# Altium PCB V3.2_Board.PcbDoc (part 3 of 9)
Units mil, origin at the board's own origin, x right, y up, seen from the top; angles counter-clockwise.
Board outline 7795.28 x 4881.89 mil, 2 copper layers (Top Layer, Bottom Layer), stack 57 mil thick; 419 components, 273 nets, 1244 pads, 414 vias.
Unrouted connection lines stored in the file: 3.
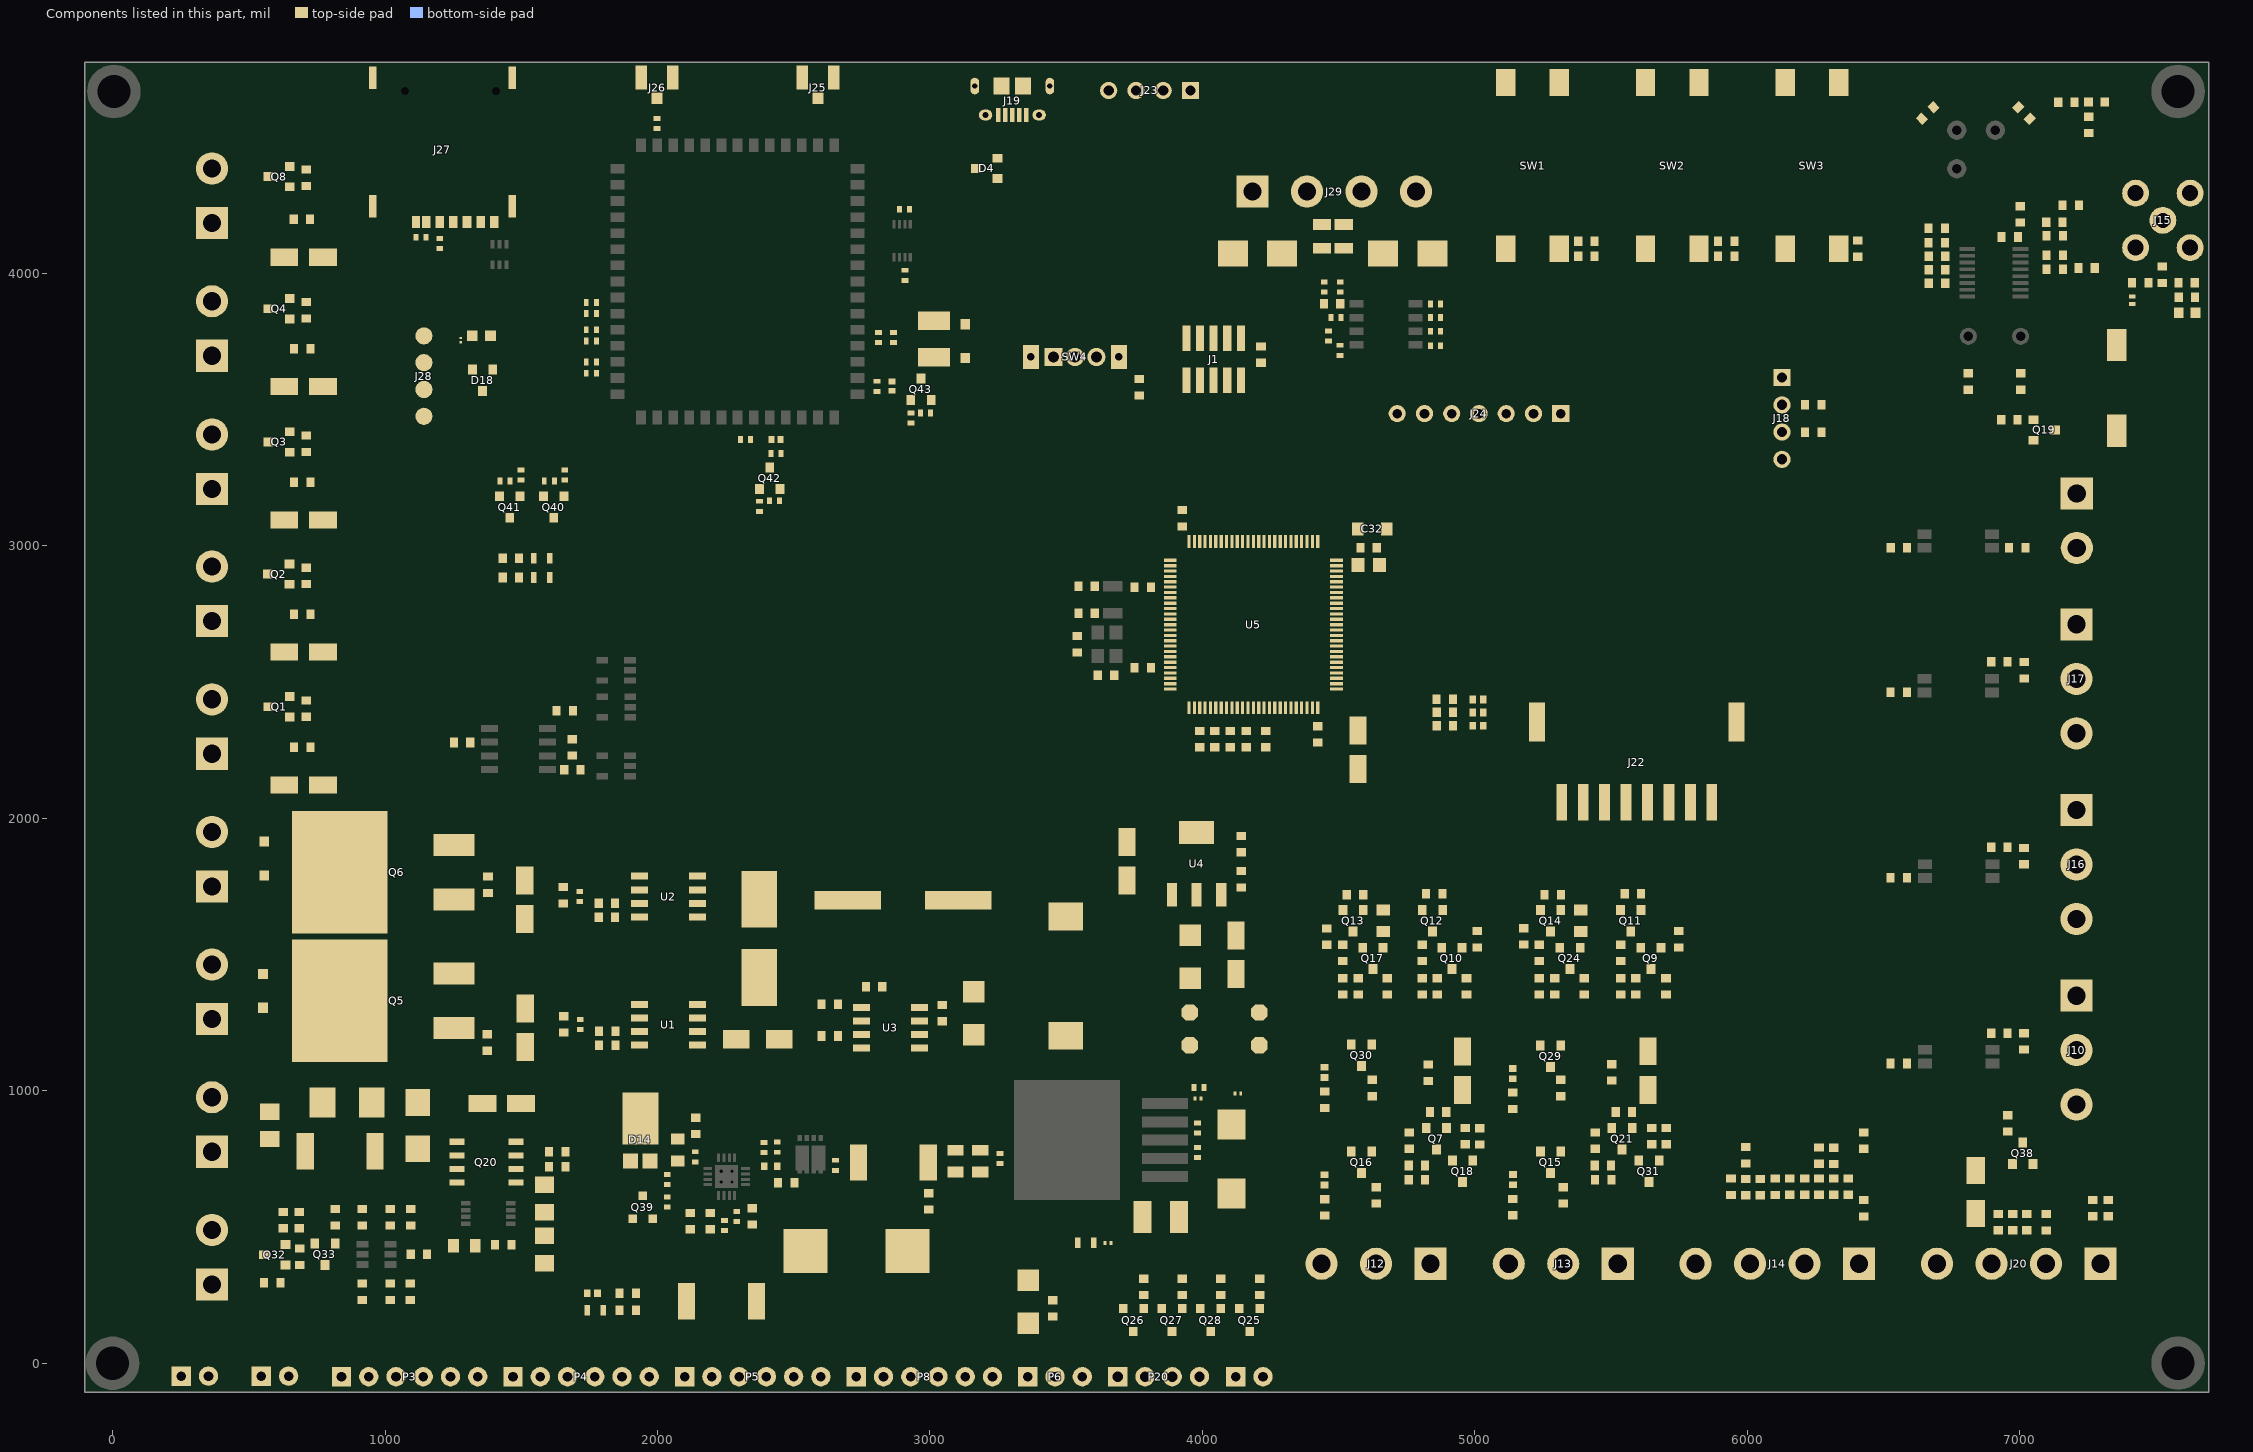
[diagram p2: the components of this part, seen from the top]

## Part data (continued)
C96 C97 C98: library part CC0402JRNPO9BN220, "CAP CER 22PF 50V C0G/NPO 0402", Case Code (Imperial)=0402, Case Code (Metric)=1005, Dielectric=C0G, Dielectric Material=Ceramic, Insulation Resistance=100GR, LCSC Part Number=C106203, Manufacturer=Yageo, Max Operating Temperature=125°C, Min Operating Temperature=-55°C, Package Quantity=1, Supplier Part Number 1=9105957, Temperature Coefficient=30ppm/°C, Tolerance=5%, Voltage=50V, Case/Package=0402, Category="Ceramic Capacitors", ComponentLink1Description=https://datasheet.ciiva.com/5789/1443161-5789509.pdf?src-supplier=Farnell, ComponentLink1URL=https://datasheet.ciiva.com/5789/1443161-5789509.pdf?src-supplier=Farnell, ComponentLink2Description=https://datasheet.ciiva.com/8033/1443161-8033606.pdf?src-supplier=Element14, ComponentLink2URL=https://datasheet.ciiva.com/8033/1443161-8033606.pdf?src-supplier=Element14, ComponentLink3Description=https://datasheet.ciiva.com/7656/1132289-7656615.pdf?src-supplier=Element14, ComponentLink3URL=https://datasheet.ciiva.com/7656/1132289-7656615.pdf?src-supplier=Element14, ComponentLink4Description=https://datasheet.ciiva.com/8033/1443161-8033607.pdf?src-supplier=Element14, ComponentLink4URL=https://datasheet.ciiva.com/8033/1443161-8033607.pdf?src-supplier=Element14, ComponentLink5Description=https://datasheet.ciiva.com/8033/1443161-8033605.pdf?src-supplier=Element14, ComponentLink5URL=https://datasheet.ciiva.com/8033/1443161-8033605.pdf?src-supplier=Element14, ComponentLink6Description=https://datasheet.ciiva.com/143/mlccorderingcode-143987.pdf?src-supplier=Digi-Key, ComponentLink6URL=https://datasheet.ciiva.com/143/mlccorderingcode-143987.pdf?src-supplier=Digi-Key, ComponentLink7Description=https://datasheet.ciiva.com/143/mlccorderingcode-143986.pdf?src-supplier=Digi-Key, ComponentLink7URL=https://datasheet.ciiva.com/143/mlccorderingcode-143986.pdf?src-supplier=Digi-Key, ComponentLink8Description=https://datasheet.ciiva.com/143/mlccorderingcode-143988.pdf?src-supplier=Digi-Key, ComponentLink8URL=https://datasheet.ciiva.com/143/mlccorderingcode-143988.pdf?src-supplier=Digi-Key, ComponentLink9Description=https://datasheet.ciiva.com/5425/upy-gp-np0-16v-to-50v-8-5425483.pdf?src-supplier=Mouser, ComponentLink9URL=https://datasheet.ciiva.com/5425/upy-gp-np0-16v-to-50v-8-5425483.pdf?src-supplier=Mouser, ComponentLink10Description=https://datasheet.ciiva.com/15189/getdatasheetpartid-370074-15189117.pdf?src-supplier=Verical, ComponentLink10URL=https://datasheet.ciiva.com/15189/getdatasheetpartid-370074-15189117.pdf?src-supplier=Verical, Depth=0.5mm, Height=0.5mm, Item Type=Capacitor, Lead Free="Lead Free", Length=1mm, Manufacturer Part Number=CC0402JRNPO9BN220, Mounting Technology="Surface Mount", Packaging="Tape and Reel", Pins=2, Pricing 1="10000=0.00220, 40000=0.00210, 150000=0.00200, 400000=0.00190, 1000000=0.00180 (USD)", Radiation Hardening=No, Reach SVHC Compliant=Yes, Resistor Type=Ceramic, RoHS=Yes, RoHS Compliant=Yes, Series=CC, Stock 1=200000, Supplier 1="Future Electronics", Termination=SMD/SMT, Thickness=0.022inch, Voltage Rating=50V, Voltage Rating (DC)=50V, Width=0.02inch
D1: "40V 500mV@2A 2A SMA(DO-214AC) Schottky Barrier Diodes (SBD) ROHS", Manufacturer=Yangzhou, ComponentLink1Description=LCSC, ComponentLink1URL=https://lcsc.com/product-detail/Schottky-Barrier-Diodes-SBD_Yangzhou-Yangjie-Elec-Tech-SS24A_C211773.html, Manufacturer Part Number=SS24A
D2: "DIODE ZENER 16V 1.5W SMA", Case/Package=SMA, Forward Voltage=1.5V, Manufacturer="ON Semiconductor", Max Operating Temperature=150°C, Max Power Dissipation=1.5W, Max Reverse Current=500nA, Min Operating Temperature=-65°C, Package Quantity=1, Power Dissipation=500mW, Supplier Part Number 1=26K5257, Test Current=23.4mA, Tolerance=5%, Voltage Rating (DC)=16V, Zener Current=94mA, Category="Zener Diodes", ComponentLink1Description=https://datasheet.ciiva.com/15142/getdatasheetpartid-39534-15142033.pdf?src-supplier=Verical, ComponentLink1URL=https://datasheet.ciiva.com/15142/getdatasheetpartid-39534-15142033.pdf?src-supplier=Verical, ComponentLink2Description=https://datasheet.ciiva.com/30478/0900766b8127698c-30478429.pdf?src-supplier=RSComponents, ComponentLink2URL=https://datasheet.ciiva.com/30478/0900766b8127698c-30478429.pdf?src-supplier=RSComponents, ComponentLink3Description=https://datasheet.ciiva.com/8026/1sma5913bt3-d-8026927.pdf?src-supplier=Element14, ComponentLink3URL=https://datasheet.ciiva.com/8026/1sma5913bt3-d-8026927.pdf?src-supplier=Element14, ComponentLink4Description=https://datasheet.ciiva.com/26092/1sma5913bt3-d-26092437.pdf?src-supplier=Avnet+Europe, ComponentLink4URL=https://datasheet.ciiva.com/26092/1sma5913bt3-d-26092437.pdf?src-supplier=Avnet+Europe, ComponentLink5Description=https://datasheet.ciiva.com/895/1sma5913bt3-d-895337.pdf?src-supplier=Digi-Key, ComponentLink5URL=https://datasheet.ciiva.com/895/1sma5913bt3-d-895337.pdf?src-supplier=Digi-Key, ComponentLink6Description=https://datasheet.ciiva.com/895/1sma5913bt3-d-895338.pdf?src-supplier=Digi-Key, ComponentLink6URL=https://datasheet.ciiva.com/895/1sma5913bt3-d-895338.pdf?src-supplier=Digi-Key, ComponentLink7Description=https://datasheet.ciiva.com/895/1sma5913bt3-d-895336.pdf?src-supplier=Digi-Key, ComponentLink7URL=https://datasheet.ciiva.com/895/1sma5913bt3-d-895336.pdf?src-supplier=Digi-Key, ComponentLink8Description=https://datasheet.ciiva.com/49028/70339291-49028059.pdf?src-supplier=Allied+Electronics, ComponentLink8URL=https://datasheet.ciiva.com/49028/70339291-49028059.pdf?src-supplier=Allied+Electronics, Contact Plating=Tin,Matte, Element Configuration=Single, ESD Protection=Yes, Halogen Free="Halogen Free", Height=2.05mm, Impedance=10R, Lead Free="Lead Free", Length=4.57mm, Manufacturer Part Number=1SMA5930BT3G, Max Reverse Leakage Current=500nA, Number of Pins=2, Packaging="Tape and Reel", Power Rating=1.5W, Pricing 1="5000=0.16900 (USD)", Radiation Hardening=No, REACH SVHC="No SVHC", RoHS=Yes, RoHS Compliant=Yes, Stock 1=52, Supplier 1=Avnet, Voltage Tolerance=5%, Width=2.92mm, Working Voltage=16V, Zener Voltage=16V
D3: "800uA 43.5A 9.2V 6.4V 5V 7V Bi-Directional SMA TVS ROHS", Manufacturer="Shandong Jingdao Microelectronics", ComponentLink1Description=LCSC, ComponentLink1URL=https://lcsc.com/product-detail/TVS_Shandong-Jingdao-Microelectronics-SMAJ5-0CA_C353441.html, Manufacturer Part Number=SMAJ5.0CA
D4 D18: "16A 20V 7V 5V@Max Unidirectional SOT-23 TVS ROHS", LCSC Part Number=C239643, Manufacturer=WILLSEMI, Package=SOT-23, ComponentLink1Description=LCSC, ComponentLink1URL=https://www.lcsc.com/product-detail/TVS_WILLSEMI-Will-Semicon-ESD5302F-3-TR_C239643.html, Item Type=Diode, Manufacturer Part Number=ESD5302F-3/TR
D5 D8: "SMB(DO-214AA) TVS ROHS", LCSC Part Number=C5331111, Manufacturer=MSKSEMI, Package=SMB(DO-214AA), ComponentLink1Description=LCSC, ComponentLink1URL=https://www.lcsc.com/product-detail/TVS_MSKSEMI-SMBJ26CA_C5331111.html, Item Type=Diode, Manufacturer Part Number=SMBJ26CA
D6: "1uA 5.3A 113V 77.8V 70V 86V Unidirectional SMB(DO-214AA) TVS ROHS", Manufacturer=Brightking, ComponentLink1Description=LCSC, ComponentLink1URL=https://www.lcsc.com/product-detail/TVS_Brightking-SMBJ70A-TR13_C309982.html, Manufacturer Part Number=SMBJ70A/TR13
D7: "SCHOTTKY DIODE SMB 100V 5A", Manufacturer=MDD, ComponentLink1Description=LCSC, ComponentLink1URL=https://lcsc.com/product-detail/Schottky-Barrier-Diodes-SBD_WEIDA-SS510B_C2915231.html, Manufacturer Part Number=SS510B
D11: "20V 500mV@3A 3A SMA(DO-214AC) Schottky Barrier Diodes (SBD) ROHS", LCSC Part Number=C34897, Manufacturer=MDD, Manufacturer Part Number=SS32, Package=SMA(DO-214AC), ComponentLink1Description=LCSC, ComponentLink1URL=https://www.lcsc.com/product-detail/Schottky-Barrier-Diodes-SBD_MDD-Microdiode-Electronics-SS32_C34897.html, Item Type=Diode
D12: "TVS DIODE 5VWM 9.2VC SMA", LCSC Part Number=Diode, Manufacturer=FTR, Package=SMA(DO-214AC), ComponentLink1Description=LCSC, ComponentLink1URL=https://www.lcsc.com/product-detail/TVS_GOODWORK-SMAJ5-0CA_C908809.html, Item Type=C693487, Manufacturer Part Number=SMAJ5.0CA
D13: "DIODE ZENER 5.1V 500MW SOD123", Breakdown Voltage=5.36V, Case/Package=SOD-123-2, Forward Voltage=900mV, LCSC Part Number=C66198, Manufacturer="ON Semiconductor", Max Operating Temperature=150°C, Max Power Dissipation=500mW, Max Reverse Current=5uA, Min Operating Temperature=-55°C, Package Quantity=3000, Supplier Part Number 1=70099546, Test Current=20mA, Tolerance=5%, Voltage Rating (DC)=5.1V, Zener Current=10mA, Category="Zener Diodes", ComponentLink1Description=https://datasheet.ciiva.com/23815/1708301-23815376.pdf?src-supplier=Newark, ComponentLink1URL=https://datasheet.ciiva.com/23815/1708301-23815376.pdf?src-supplier=Newark, ComponentLink2Description=https://datasheet.ciiva.com/22626/1708301-22626967.pdf?src-supplier=Element14, ComponentLink2URL=https://datasheet.ciiva.com/22626/1708301-22626967.pdf?src-supplier=Element14, ComponentLink3Description=https://datasheet.ciiva.com/4731/mmsz5221bt1-d-4731452.pdf?src-supplier=Mouser, ComponentLink3URL=https://datasheet.ciiva.com/4731/mmsz5221bt1-d-4731452.pdf?src-supplier=Mouser, ComponentLink4Description=https://datasheet.ciiva.com/16200/mmsz5221bt1-d-16200104.pdf?src-supplier=Future+Electronics, ComponentLink4URL=https://datasheet.ciiva.com/16200/mmsz5221bt1-d-16200104.pdf?src-supplier=Future+Electronics, ComponentLink5Description=https://datasheet.ciiva.com/894/mmsz5221bt1-d-894882.pdf?src-supplier=Digi-Key, ComponentLink5URL=https://datasheet.ciiva.com/894/mmsz5221bt1-d-894882.pdf?src-supplier=Digi-Key, ComponentLink6Description=https://datasheet.ciiva.com/894/mmsz5221bt1-d-894883.pdf?src-supplier=Digi-Key, ComponentLink6URL=https://datasheet.ciiva.com/894/mmsz5221bt1-d-894883.pdf?src-supplier=Digi-Key, ComponentLink7Description=https://datasheet.ciiva.com/894/mmsz5221bt1-d-894881.pdf?src-supplier=Digi-Key, ComponentLink7URL=https://datasheet.ciiva.com/894/mmsz5221bt1-d-894881.pdf?src-supplier=Digi-Key, Height=1.12mm, Impedance=17R, Item Type=Diode, Lead Free="Lead Free", Length=2.69mm, Manufacturer Part Number=MMSZ5231BT1G, Material=Plastic, Max Reverse Leakage Current=5uA, Packaging="Tape and Reel", Pins=2, Power Dissipation=500mW, Power Rating=500mW, Reach SVHC Compliant=No, RoHS=Yes, RoHS Compliant=Yes, Series="Automotive, AEC-Q101", Supplier 1="Allied Electronics", Voltage Tolerance=5%, Width=1.6mm, Working Voltage=5.1V, Zener Voltage=5.1V
D14: "DIODE SCHOTTKY 40V 10A POWERDI5", Average Rectified Current=10A, Forward Voltage=510mV, Manufacturer=Diodes, Max Forward Surge Current (Ifsm)=275A, Max Operating Temperature=180°C, Max Repetitive Reverse Voltage (Vrrm)=40V, Max Reverse Current=700uA, Min Operating Temperature=-65°C, Package Quantity=5000, Supplier Part Number 1=7514648, Category="Rectifier Diodes", ComponentLink1Description=https://datasheet.ciiva.com/34302/1541335-34302410.pdf?src-supplier=Jameco, ComponentLink1URL=https://datasheet.ciiva.com/34302/1541335-34302410.pdf?src-supplier=Jameco, ComponentLink2Description=https://datasheet.ciiva.com/4715/ds30538-79818-4715685.pdf?src-supplier=Mouser, ComponentLink2URL=https://datasheet.ciiva.com/4715/ds30538-79818-4715685.pdf?src-supplier=Mouser, ComponentLink3Description=https://datasheet.ciiva.com/8300/ds30538-8300993.pdf?src-supplier=Avnet, ComponentLink3URL=https://datasheet.ciiva.com/8300/ds30538-8300993.pdf?src-supplier=Avnet, ComponentLink4Description=https://datasheet.ciiva.com/7964/ds30538-7964283.pdf?src-supplier=Element14, ComponentLink4URL=https://datasheet.ciiva.com/7964/ds30538-7964283.pdf?src-supplier=Element14, ComponentLink5Description=https://datasheet.ciiva.com/16215/ds30538-16215597.pdf?src-supplier=Future+Electronics, ComponentLink5URL=https://datasheet.ciiva.com/16215/ds30538-16215597.pdf?src-supplier=Future+Electronics, ComponentLink6Description=https://datasheet.ciiva.com/915/ds30538-915075.pdf?src-supplier=Digi-Key, ComponentLink6URL=https://datasheet.ciiva.com/915/ds30538-915075.pdf?src-supplier=Digi-Key, ComponentLink7Description=https://datasheet.ciiva.com/915/ds30538-915076.pdf?src-supplier=Digi-Key, ComponentLink7URL=https://datasheet.ciiva.com/915/ds30538-915076.pdf?src-supplier=Digi-Key, ComponentLink8Description=https://datasheet.ciiva.com/915/ds30538-915074.pdf?src-supplier=Digi-Key, ComponentLink8URL=https://datasheet.ciiva.com/915/ds30538-915074.pdf?src-supplier=Digi-Key, Contact Plating=Tin,Matte, Current Rating=10A, Element Configuration="Common Anode", Forward Current=10A, Height=1.15mm, Lead Free="Lead Free", Length=4.05mm, Manufacturer Part Number=PDS1040-13, Max Reverse Voltage (DC)=40V, Mount="Surface Mount", Number of Pins=5, Output Current=10A, Packaging="Tape and Reel", Peak Non-Repetitive Surge Current=275A, Polarity=Standard, Pricing 1="5=1.28400, 50=1.16000, 250=1.05000, 1250=0.93400, 2500=0.82200 (GBP)", Radiation Hardening=No, REACH SVHC="No SVHC", RoHS=Yes, RoHS Compliant=Yes, Series=-, Stock 1=140, Supplier 1=RSComponents, Termination=SMD/SMT, Voltage Rating (DC)=40V, Weight=0.003386oz, Width=5.45mm
D15: "DIODE SCHOTTKY 40V 380MA SOD523", Average Rectified Current=380mA, Forward Current=650mA, Forward Voltage=1V, LCSC Part Number=C139441, Manufacturer="Diodes Zetex", Max Forward Surge Current (Ifsm)=6A, Max Operating Temperature=150°C, Max Power Dissipation=357mW, Max Repetitive Reverse Voltage (Vrrm)=40V, Max Reverse Current=4uA, Min Operating Temperature=-55°C, Package Quantity=3000, Supplier Part Number=8115933, Category="Schottky Diodes", ComponentLink1Description=https://datasheet.ciiva.com/4715/zlls350-4715700.pdf?src-supplier=Mouser, ComponentLink1URL=https://datasheet.ciiva.com/4715/zlls350-4715700.pdf?src-supplier=Mouser, ComponentLink2Description=https://datasheet.ciiva.com/4715/zlls350-4715700.pdf?src-supplier=Avnet, ComponentLink2URL=https://datasheet.ciiva.com/4715/zlls350-4715700.pdf?src-supplier=Avnet, ComponentLink3Description=https://datasheet.ciiva.com/914/zlls350-914217.pdf?src-supplier=Digi-Key, ComponentLink3URL=https://datasheet.ciiva.com/914/zlls350-914217.pdf?src-supplier=Digi-Key, ComponentLink4Description=https://datasheet.ciiva.com/914/zlls350-914218.pdf?src-supplier=Digi-Key, ComponentLink4URL=https://datasheet.ciiva.com/914/zlls350-914218.pdf?src-supplier=Digi-Key, ComponentLink5Description=https://datasheet.ciiva.com/914/zlls350-914216.pdf?src-supplier=Digi-Key, ComponentLink5URL=https://datasheet.ciiva.com/914/zlls350-914216.pdf?src-supplier=Digi-Key, Current Rating=380mA, Diode Type=RECTIFIER, Height=0.8mm, Item Type=Diode, Lead Free="Lead Free", Length=1.3mm, Manufacturer Part Number=ZLLS350TA, Max Reverse Voltage (DC)=40V, Mounting Technology="Surface Mount", Output Current=380mA, Packaging="Tape and Reel", Peak Non-Repetitive Surge Current=6A, Pins=2, Polarity=Standard, Power Dissipation=357mW, Power Rating=357mW, Pricing="3000=0.102, 9000=0.0979, 12000=0.0969, 30000=0.0937, 45000=0.0906 (USD)", Radiation Hardening=No, Reverse Recovery Time=1ns, RoHS=Yes, RoHS Compliant=Yes, Series=-, Stock=78000, Supplier="Future Electronics", Termination=SMD/SMT, Voltage Rating (DC)=40V, Weight=3.5E-05oz, Width=0.9mm
D16 D19: "35A@8/20us 15V 4.5V@Max Unidirectional DFN1006 TVS ROHS", LCSC Part Number=C239784, Manufacturer="WILLSEMI(Will Semicon)", Package=DFN1006, ComponentLink1Description=LCSC, ComponentLink1URL=https://www.lcsc.com/product-detail/TVS_WILLSEMI-Will-Semicon-ESD5651N-2-TR_C239784.html, Item Type=Diode, Manufacturer Part Number=ESD5651N-2/TR
D17: "TVS DIODE 5VWM 6.3VC DSN0603-2", LCSC Part Number=C477989, Manufacturer=Nexperia, Category="ESD and Circuit Protection ICs", ComponentLink1Description=http://www.farnell.com/datasheets/1961312.pdf?src-supplier=Farnell, ComponentLink1URL=http://www.farnell.com/datasheets/1961312.pdf?src-supplier=Farnell, ComponentLink2Description=https://assets.nexperia.com/documents/data-sheet/PESD5V0H1BSF.pdf?src-supplier=Digi-Key, ComponentLink2URL=https://assets.nexperia.com/documents/data-sheet/PESD5V0H1BSF.pdf?src-supplier=Digi-Key, ComponentLink3Description=http://www.farnell.com/datasheets/1961312.pdf?src-supplier=Newark, ComponentLink3URL=http://www.farnell.com/datasheets/1961312.pdf?src-supplier=Newark, Item Type=Diode, Manufacturer Part Number=PESD5V0H1BSFYL, Pricing 1="18000=0.06453, 36000=0.06278, 54000=0.06104, 90000=0.05930, 180000=0.05755, 900000=0.05581, 1800000=0.05406 (USD)", RoHS=Yes, RoHS Compliant=Yes, Stock 1=9000, Supplier 1=Avnet, Supplier Part Number 1=PESD5V0H1BSFYL
D25 D26: "DIODE GEN PURP 100V 300MA SOD123", Average Rectified Current=300mA, Current Rating=150mA, Forward Voltage=1.25V, LCSC Part Number=C83528, Manufacturer=Diodes, Max Forward Surge Current (Ifsm)=2A, Max Operating Temperature=150°C, Max Repetitive Reverse Voltage (Vrrm)=100V, Max Reverse Current=1uA, Min Operating Temperature=-65°C, Package Quantity=3000, Power Dissipation=400mW, Supplier Part Number 1=7634694, Voltage Rating (DC)=75V, Category="Rectifier Diodes", ComponentLink1Description=https://datasheet.ciiva.com/1179/1915529-1179304.pdf?src-supplier=Element14, ComponentLink1URL=https://datasheet.ciiva.com/1179/1915529-1179304.pdf?src-supplier=Element14, ComponentLink2Description=https://datasheet.ciiva.com/22695/1915529-22695239.pdf?src-supplier=Element14, ComponentLink2URL=https://datasheet.ciiva.com/22695/1915529-22695239.pdf?src-supplier=Element14, ComponentLink3Description=https://datasheet.ciiva.com/8300/ds30086-8300392.pdf?src-supplier=Avnet, ComponentLink3URL=https://datasheet.ciiva.com/8300/ds30086-8300392.pdf?src-supplier=Avnet, ComponentLink4Description=https://datasheet.ciiva.com/15219/getdatasheetpartid-110030-15219548.pdf?src-supplier=Verical, ComponentLink4URL=https://datasheet.ciiva.com/15219/getdatasheetpartid-110030-15219548.pdf?src-supplier=Verical, ComponentLink5Description=https://datasheet.ciiva.com/8303/ds30086-8303197.pdf?src-supplier=Avnet, ComponentLink5URL=https://datasheet.ciiva.com/8303/ds30086-8303197.pdf?src-supplier=Avnet, ComponentLink6Description=https://datasheet.ciiva.com/911/ds30086-911735.pdf?src-supplier=Digi-Key, ComponentLink6URL=https://datasheet.ciiva.com/911/ds30086-911735.pdf?src-supplier=Digi-Key, ComponentLink7Description=https://datasheet.ciiva.com/911/ds30086-911736.pdf?src-supplier=Digi-Key, ComponentLink7URL=https://datasheet.ciiva.com/911/ds30086-911736.pdf?src-supplier=Digi-Key, ComponentLink8Description=https://datasheet.ciiva.com/911/ds30086-911734.pdf?src-supplier=Digi-Key, ComponentLink8URL=https://datasheet.ciiva.com/911/ds30086-911734.pdf?src-supplier=Digi-Key, ComponentLink9Description=https://datasheet.ciiva.com/4435/ds30086-4435128.pdf?src-supplier=Mouser, ComponentLink9URL=https://datasheet.ciiva.com/4435/ds30086-4435128.pdf?src-supplier=Mouser, Contact Plating=Tin,Matte, Element Configuration=Single, Forward Current=150mA, Height=1.25mm, Item Type=Diode, Lead Free="Lead Free", Length=2.85mm, Manufacturer Part Number=1N4148W-7-F, Max Reverse Voltage (DC)=100V, Max Surge Current=2A, Mounting Technology="Surface Mount", Output Current=150mA, Packaging="Tape and Reel", Peak Non-Repetitive Surge Current=2A, Pins=2, Polarity=Standard, Power Rating=400mW, Pricing 1="3000=0.01840, 12000=0.01760, 45000=0.01690, 120000=0.01640, 300000=0.01560 (USD)", Radiation Hardening=No, Reach SVHC Compliant=Yes, Recovery Time=4ns, Reverse Recovery Time=4ns, Reverse Recovery Time-Max=4ns, RoHS=Yes, RoHS Compliant=Yes, Series=-, Stock 1=32931000, Supplier 1="Future Electronics", Voltage=100V, Weight=0.000353oz, Width=1.7mm
F1: "6V 500mA 40A 1A 0603 Resettable Fuses ROHS", LCSC Part Number=C69679, Manufacturer=TECHFUSE, Category=Uncategorized, ComponentLink1Description=LCSC, ComponentLink1URL=https://www.lcsc.com/product-detail/Resettable-Fuses_TECHFUSE-SMD0603-050_C69679.html, Item Type=Fuse, Manufacturer Part Number=SMD0603-050, RoHS=No, Supplier 1=LCSC, Supplier Part Number 1=C69679
F2 F3: "9V 200mA 100A 500mA 0805 Resettable Fuses ROHS", LCSC Part Number=C20976, Manufacturer=RUILON, Package=0805, ComponentLink1Description=LCSC, ComponentLink1URL=https://www.lcsc.com/product-detail/Resettable-Fuses_RUILON-Shenzhen-Ruilongyuan-Elec-SMD0805P020TF_C20976.html, Item Type=Fuse, Manufacturer Part Number=SMD0805P020TF
J1: "CONN HEADER SMD 10POS 1.27MM", Color=Black, Contact Resistance=30mR, Current Rating=1A, Insulation Resistance=100MR, LCSC Part Number=C150517, Manufacturer="Amphenol FCI", Max Operating Temperature=85°C, Max Voltage Rating (AC)=125V, Min Operating Temperature=-40°C, Package Quantity=600, Supplier Part Number 1=609-3695-6-ND, ComponentLink1Description=https://www.verical.com/server-webapp/html/getDatasheet?partID=177140&src-supplier=Verical, ComponentLink1URL=https://www.verical.com/server-webapp/html/getDatasheet?partID=177140&src-supplier=Verical, ComponentLink2Description=http://portal.fciconnect.com/Comergent/fci/drawing/20021121.pdf?src-supplier=Avnet, ComponentLink2URL=http://portal.fciconnect.com/Comergent/fci/drawing/20021121.pdf?src-supplier=Avnet, ComponentLink3Description=https://cdn.amphenol-icc.com/media/wysiwyg/files/drawing/20021121.pdf?src-supplier=Digi-Key, ComponentLink3URL=https://cdn.amphenol-icc.com/media/wysiwyg/files/drawing/20021121.pdf?src-supplier=Digi-Key, ComponentLink4Description=http://portal.fciconnect.com/Comergent/fci/drawing/20021121.pdf?src-supplier=Avnet+Europe, ComponentLink4URL=http://portal.fciconnect.com/Comergent/fci/drawing/20021121.pdf?src-supplier=Avnet+Europe, ComponentLink5Description=https://media.digikey.com/pdf/Data%20Sheets/FCI%20PDFs/Minitek%20127_Catalog.pdf?src-supplier=Digi-Key, ComponentLink5URL=https://media.digikey.com/pdf/Data%20Sheets/FCI%20PDFs/Minitek%20127_Catalog.pdf?src-supplier=Digi-Key, ComponentLink6Description=http://portal.fciconnect.com/Comergent//fci/drawing/20021121.pdf?src-supplier=Mouser, ComponentLink6URL=http://portal.fciconnect.com/Comergent//fci/drawing/20021121.pdf?src-supplier=Mouser, Connector Type="Male Pin,Header", Contact Material="Copper Alloy,Copper,Gold", Contact Mating Length=0.12inch, Contact Plating=Gold, Depth=3.4mm, Gender=Male, Housing Color=Black, Housing Material=Thermoplastic, Item Type="Jtag Header", Length=6.35mm, Manufacturer Part Number=20021121-00010C4LF, Mount="Surface Mount", Number of Contacts=10, Number of Positions=10, Number of Rows=2, Orientation=Straight, Packaging="Tape and Reel", Pitch=1.27mm, Pricing 1="1=0.87, 10=0.761, 100=0.6563 (USD)", Radiation Hardening=No, REACH SVHC="No SVHC", Row Spacing=0.05inch, Stack Height=3mm, Stock 1=0, Supplier 1=Digi-Key, Termination=Solder, Voltage Rating=125V
J2 J3 J4 J5 J6 J7 J8 J9 J10 J11 J12 J13 J14 J16 J17 J20 J21 J29: "TERMINAL BLOCK, PLUGGABLE, 5.08,", Manufacturer="CUI Devices", Category="Terminal Blocks", RoHS=Yes, Supplier 1="Arrow Electronics"
  J2 J3 J4 J5 J6 J7 J8 J9 J11 J21: Manufacturer Part Number=TBP01R1-508-02BE, Pricing 1="1=0.57450, 10=0.23530, 25=0.18730, 50=0.17170, 100=0.16040, 400=0.14010, 800=0.12060, 1200=0.11290 (USD)", Stock 1=1821, Supplier Part Number 1=TBP01R1-508-02BE
  J10 J12 J13 J16 J17: Manufacturer Part Number=TBP01R1-508-03BE, Pricing 1="1=0.52380, 10=0.21370, 100=0.18450, 600=0.17070 (USD)", Stock 1=2069, Supplier Part Number 1=TBP01R1-508-03BE
  J14 J20 J29: Manufacturer Part Number=TBP01R1-508-04BE, Pricing 1="1=0.77380, 10=0.29040, 25=0.28750, 50=0.25070, 200=0.24820, 400=0.24580, 600=0.22570 (USD)", Stock 1=697, Supplier Part Number 1=TBP01R1-508-04BE
J15: "1 Inner bore SMA Board Edge Bend -55℃~+155℃ 50Ω Plugin RF Connectors / Coaxial Connectors ROHS", Manufacturer="HJ Tech", ComponentLink1Description=LCSC, ComponentLink1URL=https://lcsc.com/product-detail/RF-Connectors-Coaxial-Connectors_HJ-Tech-HJ-SMA508_C1509209.html, Manufacturer Part Number=HJ-SMA508
J18: "2.54mm Plugin 3A bronze -40℃~+105℃ Straight 1x4P Top 4 Square Holes Plugin,P=2.54mm Female Headers ROHS", Manufacturer=BOOMELE, Package=Plugin,P=2.54mm, ComponentLink1Description=LCSC, ComponentLink1URL=https://www.lcsc.com/product-detail/Female-Headers_BOOMELE-Boom-Precision-Elec-C2718488_C2718488.html, Item Type=Header, LCSC Part Number=C2718488, Manufacturer Part Number=C2718488
J19: "CONN RCPT USB2.0 MICRO B SMD R/A", Color=Black, Current Rating=1.8A, Flammability Rating="UL94 V-0", Insulation Resistance=1GR, LCSC Part Number=C132563, Manufacturer="Amphenol FCI", Max Operating Temperature=85°C, Max Voltage Rating (AC)=100V, Min Operating Temperature=-55°C, Package Quantity=9600, Supplier Part Number 1=609-4618-1-ND, ComponentLink1Description=http://www.amphenol-icc.com/media/wysiwyg/files/drawing/10118194.pdf?src-supplier=Digi-Key, ComponentLink1URL=http://www.amphenol-icc.com/media/wysiwyg/files/drawing/10118194.pdf?src-supplier=Digi-Key, ComponentLink2Description=https://cdn.amphenol-icc.com/media/wysiwyg/files/drawing/10118194.pdf?src-supplier=Mouser, ComponentLink2URL=https://cdn.amphenol-icc.com/media/wysiwyg/files/drawing/10118194.pdf?src-supplier=Mouser, ComponentLink3Description=https://cdn.amphenol-icc.com/media/wysiwyg/files/drawing/10118194.pdf?src-supplier=Verical, ComponentLink3URL=https://cdn.amphenol-icc.com/media/wysiwyg/files/drawing/10118194.pdf?src-supplier=Verical, Connector Type=USB,Receptacle, Contact Material="Copper Alloy", Contact Plating=Gold, Depth=5mm, Features=Shielded, Gender=Receptacle, Housing Material=Polymer, Item Type="USB Connector", Lead Free="Lead Free", Length=8.05mm, Manufacturer Part Number=10118194-0001LF, Mount="Surface Mount,Horizontal", Number of Contacts=5, Number of Ports=1, Number of Terminals=5, Orientation="Right Angle", Packaging="Tape and Reel", Pitch=0.65mm, Pricing 1="1=0.43, 10=0.405, 25=0.3648, 50=0.3242, 100=0.3107, 250=0.28368, 500=0.27016 (USD)", Radiation Hardening=No, Stock 1=35943, Supplier 1=Digi-Key, Termination=Solder
J22: "1x8P PH 1 2mm 8 Brass SMD,P=2mm Wire To Board / Wire To Wire Connector ROHS", LCSC Part Number=C273136, Manufacturer=CJT, Package=SMD,P=2mm, ComponentLink1Description=LCSC, ComponentLink1URL=https://www.lcsc.com/product-detail/_Changjiang-Connectors-A2008WR-S-8P_C273136.html, Item Type="Wire To Wire Connector", Manufacturer Part Number=A2008WR-S-8P
J23: "Straight 2.54mm Black Brass 1x4P Plugin,P=2.54mm Pin Headers ROHS", LCSC Part Number=C124378, Manufacturer=Ckmtw, ComponentLink1Description=LCSC, ComponentLink1URL=https://www.lcsc.com/product-detail/Pin-Headers_Ckmtw-Shenzhen-Cankemeng-B-2100S04P-A110_C124378.html, Item Type=Header, Manufacturer Part Number=B-2100S04P-A110
J24: "Straight Square Pins 2.5mm 7P 6mm -40℃~+105℃ 3mm 2.54mm Plugin Black Brass 1x7P Plugin,P=2.54mm Pin Headers ROHS", LCSC Part Number=C492406, Manufacturer=XFCN, Package=Plugin,P=2.54mm, ComponentLink1Description=LCSC, ComponentLink1URL=https://www.lcsc.com/product-detail/span-style-background-color-ff0-Pin-span-Headers_XFCN-PZ254V-11-07P_C492406.html, Item Type="Male Header", Manufacturer Part Number=PZ254V-11-07P
J25 J26: "CONN U.FL RCPT STR 50 OHM SMD", Case/Package=SMD/SMT, LCSC Part Number=C88374, Manufacturer=Hirose, Package Quantity=10000, Supplier Part Number 1=U.FL-R-SMT-1(80)-CUTT, ComponentLink1Description=https://www.hirose.com/product/en/download_file/key_name/U.FL-R-SMT-1%2880%29/category/Specification%20Sheet/doc_file_id/37638/?file_category_id=9&item_id=03310472280&is_series=&src-supplier=Digi-Key, ComponentLink1URL=https://www.hirose.com/product/en/download_file/key_name/U.FL-R-SMT-1%2880%29/category/Specification%20Sheet/doc_file_id/37638/?file_category_id=9&item_id=03310472280&is_series=&src-supplier=Digi-Key, ComponentLink2Description=http://www.mouser.com/ds/2/185/U.FL_catalog-939761.pdf?src-supplier=Mouser, ComponentLink2URL=http://www.mouser.com/ds/2/185/U.FL_catalog-939761.pdf?src-supplier=Mouser, Lead Free="Lead Free", Manufacturer Part Number=U.FL-R-SMT-1(80), Packaging="Tape and Reel", Pricing 1="1=1.07, 500=0.785, 1500=0.74, 2500=0.72, 5000=0.695 (USD)", Stock 1=1272, Supplier 1="Future Electronics"
J27: "Copper Alloy Self bomb Gold plating 1.25mm Deck -40℃~+85℃ 260℃ NanoSIM SMD SIM Card Connectors ROHS", LCSC Part Number=C381071, Manufacturer="XKB Connectivity", Package="SMD Custom", ComponentLink1Description=LCSC, ComponentLink1URL=https://www.lcsc.com/product-detail/SIM-Card-Connectors_XKB-Connectivity-XKNANO-113_C381071.html, Item Type="SIM Card Connectors", Manufacturer Part Number=XKNANO-113
J28: "Pogo Pad 2.5mm 4 Pin", Item Type="Pogo Connector", Manufacturer Part Number="POGO Connector 4 Pin"
L1: library part MGFL2012F100MT-LF, "500mA 10uH ±20% 320mΩ 0805 Inductors", Manufacturer=Microgate, ComponentLink1Description="New link", ComponentLink1URL=https://lcsc.com/product-detail/Inductors-SMD_microgate-MGFL2012F100MT-LF_C281113.html, Manufacturer Part Number=MGFL2012F100MT-LF
L2: library part SLF12575T-221M1R3-PF, "Inductor Power Shielded Wirewound 220uH 20% 1KHz Ferrite 1.3A 310mOhm DCR Blister T/R", Case/Package=Nonstandard, Current Rating=1.3A, DC Resistance (DCR)=310mR, Manufacturer=TDK, Max Operating Temperature=105°C, Min Operating Temperature=-20°C, Package Quantity=500, Resistor Type=Wirewound, Supplier Part Number 1=445-174412-1-ND, Test Frequency=1kHz, Tolerance=20%, Category="Fixed Inductors", ComponentLink1Description=https://datasheet.ciiva.com/11802/0900766b812b7d4f-11802208.pdf?src-supplier=RSComponents, ComponentLink1URL=https://datasheet.ciiva.com/11802/0900766b812b7d4f-11802208.pdf?src-supplier=RSComponents, Core Material=Ferrite, DC Current=1.3A, Depth=12.8mm, Height=0.295inch, Height - Seated (Max)=0.309inch, Inductance=220uH, Lead Free="Lead Free", Length=12.5mm, Manufacturer Part Number=SLF12575T-221M1R3-PF, Max DC Current=1.3A, Military Standard=Not, Mount="Surface Mount", Packaging="Tape and Reel", Pricing 1="1=1.97000, 10=1.81500, 25=1.66360, 50=1.42180, 100=1.27050, 250=1.08900 (USD)", RoHS=Yes, RoHS Compliant=Yes, Saturation Current=1.3A, Series=SLF, Shielding=Shielded, Stock 1=1079, Supplier 1=Digi-Key, Termination=SMD/SMT, Width=12.5mm
L3: library part LQW15AN39NG80D, "FIXED IND 39NH 530MA 456MOHM SMD", Case Code (Imperial)=0402, Case Code (Metric)=1005, Current Rating=530mA, DC Resistance (DCR)=456mR, Manufacturer=Murata, Max Operating Temperature=125°C, Min Operating Temperature=-55°C, Package Quantity=1, Resistor Type=Wirewound, Self Resonant Frequency=3.4GHz, Test Frequency=100MHz, Tolerance=2%, Case/Package=0402, Category="Fixed Inductors", ComponentLink1Description=https://datasheet.ciiva.com/24054/product-260692-24054907.pdf?src-supplier=Mouser, ComponentLink1URL=https://datasheet.ciiva.com/24054/product-260692-24054907.pdf?src-supplier=Mouser, ComponentLink2Description=https://datasheet.ciiva.com/29696/l0075e-29696874.pdf?src-supplier=Digi-Key, ComponentLink2URL=https://datasheet.ciiva.com/29696/l0075e-29696874.pdf?src-supplier=Digi-Key, ComponentLink3Description=https://datasheet.ciiva.com/29696/l0075e-29696875.pdf?src-supplier=Digi-Key, ComponentLink3URL=https://datasheet.ciiva.com/29696/l0075e-29696875.pdf?src-supplier=Digi-Key, ComponentLink4Description=https://datasheet.ciiva.com/29696/l0075e-29696876.pdf?src-supplier=Digi-Key, ComponentLink4URL=https://datasheet.ciiva.com/29696/l0075e-29696876.pdf?src-supplier=Digi-Key, Core Material=Non-Magnetic, Height=0.5mm, Height - Seated (Max)=0.024inch, Inductance=39nH, Length=0.039inch, Manufacturer Part Number=LQW15AN39NG80D, Max DC Current=530mA, Mount="Surface Mount", Packaging="Tape and Reel", Pricing 1="1=0.25260, 10=0.20140, 25=0.19280, 100=0.14770, 250=0.13910, 500=0.12490, 1000=0.10220, 3000=0.08400, 6000=0.08290 (USD)", Q Factor=28, RoHS=Yes, RoHS Compliant=Yes, Shielding=Unshielded, Stock 1=7835, Supplier 1="Arrow Electronics", Supplier Part Number 1=LQW15AN39NG80D, Termination=SMD/SMT, Width=0.024inch
L4: library part HSC0603-33NJ-T, "600mA 33nH ±5% 220mΩ SMD,1.8x1.2x1.02mm Inductors (SMD) ROHS", Manufacturer=EMTEK, ComponentLink1Description=LCSC, ComponentLink1URL=https://www.lcsc.com/product-detail/Inductors-span-style-background-color-ff0-SMD-span_EMTEK-HSC0603-33NJ-T_C251779.html, Manufacturer Part Number=HSC0603-33NJ-T
L5: library part YSPI1040-3R3M, "11A 3.3uH ±20% 10.8mΩ SMD", Manufacturer=YJYCOIN, ComponentLink1Description=LCSC, ComponentLink1URL=https://lcsc.com/product-detail/Power-Inductors_YJYCOIN-YSPI1040-3R3M_C351102.html, Manufacturer Part Number=YSPI1040-3R3M
LED1 LED2 LED3 LED4 LED5 LED6 LED7: "LED RED CLEAR CHIP SMD", Case Code (Imperial)=0402, Case Code (Metric)=1005, Color=Red, Forward Voltage=1.95V, Lens Color=Colorless, Manufacturer=SunLED, Supplier Part Number 1=1497-1174-6-ND, Test Current=20mA, Case/Package=0402, ComponentLink1Description=http://www.sunledusa.com/products/spec/XZMDK68W-2.pdf?src-supplier=Digi-Key, ComponentLink1URL=http://www.sunledusa.com/products/spec/XZMDK68W-2.pdf?src-supplier=Digi-Key, ComponentLink2Description=https://www.sunledusa.com/products/spec/XZMDK68W-2.pdf?src-supplier=Digi-Key, ComponentLink2URL=https://www.sunledusa.com/products/spec/XZMDK68W-2.pdf?src-supplier=Digi-Key, Dominant Wavelength=630nm, Height=0.6mm, Length=1mm, Lens Transparency=Clear, Luminous Intensity=69mcd, Manufacturer Part Number=XZMDK68W-2, Mount="Surface Mount", Packaging="Tape and Reel", Pricing 1="1=0.43, 10=0.306, 100=0.136, 500=0.0952, 1000=0.0782 (USD)", Stock 1=69539, Supplier 1=Digi-Key, Viewing Angle=120°, Width=0.5mm
LED8: "SENSOR PHOTO 630NM 2SMD", Case/Package=SMD/SMT, Collector Emitter Breakdown Voltage=5.5V, Dark Current=100nA, Manufacturer=Everlight, Max Operating Temperature=85°C, Min Operating Temperature=-40°C, Package Quantity=1, Supplier Part Number 1=1080-1244-1-ND, Category=Sensors, ComponentLink1Description=https://datasheet.ciiva.com/12092/als-pt19-315c-l177-tr-datasheet-34741-12092024.pdf?src-supplier=Mouser, ComponentLink1URL=https://datasheet.ciiva.com/12092/als-pt19-315c-l177-tr-datasheet-34741-12092024.pdf?src-supplier=Mouser, ComponentLink2Description=https://datasheet.ciiva.com/4270/alspt19315cl177-tr8-1810-4270796.pdf?src-supplier=Arrow+Electronics, ComponentLink2URL=https://datasheet.ciiva.com/4270/alspt19315cl177-tr8-1810-4270796.pdf?src-supplier=Arrow+Electronics, Fall Time=0.22ms, Lens Style=Flat, Manufacturer Part Number=ALS-PT19-315C/L177/TR8, Max Breakdown Voltage=5.5V, Mount="Surface Mount", Number of Elements=1, Number of Pins=2, Packaging="Tape and Reel", Polarity=NPN, Pricing 1="1=0.46000, 5=0.41800, 10=0.37100, 25=0.33200, 50=0.29180, 100=0.24880, 500=0.20576, 1000=0.17226 (USD)", Radiation Hardening=No, Rise Time=0.11ms, RoHS=Yes, RoHS Compliant=Yes, Stock 1=41849, Supplier 1=Digi-Key, Wavelength=630nm
LED9: library part NCD0603R3, "RED LED 0603 Light Emitting Diodes", LCSC Part Number=C3151730, Manufacturer="Foshan NationStar Optoelectronics", Package=0603, ComponentLink1Description=LCSC, ComponentLink1URL=https://www.lcsc.com/product-detail/Light-Emitting-Diodes-LED_Foshan-NationStar-Optoelectronics-NCD0603R3_C3151730.html, Item Type=LED, Manufacturer Part Number=NCD0603R3
LED10: library part 16-213/GHC-YR1S1/3T, "Green 520~535nm 0402 Light Emitting Diodes (LED) RoHS", LCSC Part Number=C74338, Manufacturer="Everlight Elec", Package=0402, ComponentLink1Description=LCSC, ComponentLink1URL=https://www.lcsc.com/product-detail/Light-Emitting-Diodes-LED_Everlight-Elec-16-213-GHC-YR1S1-3T_C74338.html, Dominant Wavelength / Coordinate rank=520~535nm, Illumination Color=Green, Item Type=LED, Luminous Intensity (IF=20mA)=112~285mcd, Manufacturer Part Number=16-213/GHC-YR1S1/3T, Mounting Type="Surface Mount"
LED11 LED13: library part 19-21/R7C-AK1L2BY/3T, "Red 632nm LED Indication - Discrete 2.05V 0603 (1608 Metric)", LCSC Part Number=C1322287, Manufacturer="Everlight Elec", Package=0603, ComponentLink1Description=LCSC, ComponentLink1URL=https://www.lcsc.com/product-detail/Light-Emitting-Diodes-LED_Everlight-Elec-19-21-R7C-AK1L2BY-3T_C1322287.html, Item Type=LED, Manufacturer Part Number=19-21/R7C-AK1L2BY/3T
LED12: library part 19-21/G6C-FM1N2B/3T, "Yellow-Green 572nm LED Indication - Discrete 2.05V 0603 (1608 Metric)", LCSC Part Number=C93689, Manufacturer="Everlight Elec", Package=0603, ComponentLink1Description=LCSC, ComponentLink1URL=https://www.lcsc.com/product-detail/Light-Emitting-Diodes-LED_Everlight-Elec-19-21-G6C-FM1N2B-3T_C93689.html, Item Type=LED, Manufacturer Part Number=19-21/G6C-FM1N2B/3T
LS1: "NO 2700Hz 85dB @ 3V, 10cm 3V Φ9mm SMD,9x3.2mm Buzzers RoHS", Frequency - Self Resonant=2700Hz, Manufacturer=Fengming, Operating Voltage="2 ~ 4V", Package=SMD,9x3.2mm, Rated Voltage=3V
P1 P7 P9 P10: library part "TEST POINT", "Test Point ON"
P3 P4 P5 P8: library part "Header 1x6", "CONN HEADER VERT 6POS 2.54MM", Color=Black, Current Rating=3A, Manufacturer="Wurth Electronics", Max Operating Temperature=125°C, Min Operating Temperature=-40°C, Supplier Part Number 1=732-5319-ND, Voltage Rating=250V, ComponentLink1Description=http://www.farnell.com/cad/1737268.pdf?src-supplier=Element14, ComponentLink1URL=http://www.farnell.com/cad/1737268.pdf?src-supplier=Element14, ComponentLink2Description=https://katalog.we-online.de/em/datasheet/6130xx11121.pdf?src-supplier=Digi-Key, ComponentLink2URL=https://katalog.we-online.de/em/datasheet/6130xx11121.pdf?src-supplier=Digi-Key, ComponentLink3Description=http://www.mouser.com/ds/2/445/6130xx11121-538006.pdf?src-supplier=Mouser, ComponentLink3URL=http://www.mouser.com/ds/2/445/6130xx11121-538006.pdf?src-supplier=Mouser, Connector Type="Male Pin", Contact Gender=Male, Contact Material="Copper Alloy,Copper", Contact Mating Length=0.236inch, Contact Plating=Gold, Gender=Male, Housing Material=PBT, Lead Free="Lead Free", Manufacturer Part Number=61300611121, Mount="Through Hole", Number of Contacts=6, Number of Positions=6, Number of Rows=1, Packaging=Bulk, Pitch=0.1inch, Pricing 1="1=0.33, 10=0.279, 25=0.232, 50=0.194, 100=0.176, 1000=0.16 (USD)", REACH SVHC=Unknown, Stock 1=14573, Supplier 1=Digi-Key, Termination="Through Hole"
P6: library part "Header 1X3", "CONN HEADER VERT 3POS 2.54MM", Color=Black, Manufacturer="Wurth Electronics", Supplier Part Number 1=732-5316-ND, ComponentLink1Description=http://www.farnell.com/cad/1737268.pdf?src-supplier=Element14, ComponentLink1URL=http://www.farnell.com/cad/1737268.pdf?src-supplier=Element14, ComponentLink2Description=https://katalog.we-online.de/em/datasheet/6130xx11121.pdf?src-supplier=Digi-Key, ComponentLink2URL=https://katalog.we-online.de/em/datasheet/6130xx11121.pdf?src-supplier=Digi-Key, Connector Type="Male Pin", Contact Material=Copper, Contact Mating Length=0.236inch, Contact Plating=Gold, Gender=Male, Lead Free="Lead Free", Manufacturer Part Number=61300311121, Mount="Through Hole", Number of Contacts=3, Number of Positions=3, Number of Rows=1, Packaging=Bulk, Pitch=0.1inch, Pricing 1="1=0.13, 10=0.106, 25=0.088, 50=0.074, 100=0.067, 1000=0.061 (USD)", REACH SVHC=Unknown, Stock 1=81286, Supplier 1=Digi-Key, Termination=Solder
P19 P27 P28: library part "Header 1x2", "CONN HEADER VERT 2POS 2.54MM", Color=Black, Current Rating=3A, Manufacturer="Wurth Electronics", Max Operating Temperature=125°C, Min Operating Temperature=-40°C, Supplier Part Number 1=732-5315-ND, Voltage Rating=250V, ComponentLink1Description=http://www.mouser.com/ds/2/445/6130xx11121-538006.pdf?src-supplier=Mouser, ComponentLink1URL=http://www.mouser.com/ds/2/445/6130xx11121-538006.pdf?src-supplier=Mouser, Connector Type="Male Pin", Contact Gender=Male, Contact Material="Copper Alloy,Copper", Contact Mating Length=0.236inch, Contact Plating=Gold, Gender=Male, Housing Material=PBT, Lead Free="Lead Free", Manufacturer Part Number=61300211121, Mount="Through Hole", Number of Contacts=2, Number of Positions=2, Number of Rows=1, Packaging=Bulk, Pitch=0.1inch, Pricing 1="1=0.13, 10=0.106, 25=0.088, 50=0.074, 100=0.067, 1000=0.061 (USD)", REACH SVHC=Unknown, Stock 1=219205, Supplier 1=Digi-Key, Termination="Through Hole"
P20: library part "Header 1x4", "CONN HEADER VERT 4POS 2.54MM", Color=Black, Manufacturer="Wurth Electronics", Supplier Part Number 1=732-5317-ND, ComponentLink1Description=http://www.farnell.com/cad/1737268.pdf?src-supplier=Element14, ComponentLink1URL=http://www.farnell.com/cad/1737268.pdf?src-supplier=Element14, ComponentLink2Description=https://katalog.we-online.de/em/datasheet/6130xx11121.pdf?src-supplier=Digi-Key, ComponentLink2URL=https://katalog.we-online.de/em/datasheet/6130xx11121.pdf?src-supplier=Digi-Key, Connector Type="Male Pin", Contact Material=Copper, Contact Mating Length=0.236inch, Contact Plating=Gold, Gender=Male, Lead Free="Lead Free", Manufacturer Part Number=61300411121, Mount="Through Hole", Number of Contacts=4, Number of Positions=4, Number of Rows=1, Packaging=Bulk, Pitch=0.1inch, Pricing 1="1=0.18, 10=0.153, 25=0.1272, 50=0.106, 100=0.096, 1000=0.088 (USD)", REACH SVHC=Unknown, Stock 1=20544, Supplier 1=Digi-Key, Termination=Solder
Q1 Q2 Q3 Q4 Q8: "Single N-Channel, 20V, 4.7A, Power MOSFET", LCSC Part Number=C601105, Manufacturer=WILLSEMI, ComponentLink1Description=LCSC, ComponentLink1URL=https://www.lcsc.com/product-detail/MOSFETs_WILLSEMI-Will-Semicon-WNM2016A-3-TR_C601105.html, Item Type=Mosfet, Manufacturer Part Number=WNM2016A-3/TR
Q5 Q6: "MOSFET N-CH 55V 110A D2PAK", LCSC Part Number=C2613, Manufacturer="Infineon Technologies", Package=D2PAK, ComponentLink1Description=LCSC, ComponentLink1URL=https://www.lcsc.com/product-detail/MOSFETs_Infineon-Technologies-IRF3205STRLPBF_C2613.html, Item Type=Mosfet, Manufacturer Part Number=IRF3205STRLPBF
Q7 Q21: "MOSFET P-CH 20V 3.7A SOT23", Case/Package=SOT-23, Continuous Drain Current (ID)=3.7A, Current Rating=-3.7A, Drain to Source Breakdown Voltage=-20V, Drain to Source Resistance=65mR, Drain to Source Voltage (Vdss)=20V, Gate to Source Voltage (Vgs)=12V, Input Capacitance=633pF, Manufacturer="International Rectifier", Max Operating Temperature=150°C, Max Power Dissipation=1.3W, Min Operating Temperature=-55°C, Package Quantity=1, Supplier Part Number 1=06X2796, Threshold Voltage=-550mV, Category=MOSFETs, ComponentLink1Description=https://datasheet.ciiva.com/7799/13209-7799017.pdf?src-supplier=Element14, ComponentLink1URL=https://datasheet.ciiva.com/7799/13209-7799017.pdf?src-supplier=Element14, ComponentLink2Description=https://datasheet.ciiva.com/34302/1563729-34302500.pdf?src-supplier=Jameco, ComponentLink2URL=https://datasheet.ciiva.com/34302/1563729-34302500.pdf?src-supplier=Jameco, ComponentLink3Description=https://datasheet.ciiva.com/28515/irlml6402pbf-28515795.pdf?src-supplier=Element14, ComponentLink3URL=https://datasheet.ciiva.com/28515/irlml6402pbf-28515795.pdf?src-supplier=Element14, ComponentLink4Description=https://datasheet.ciiva.com/7333/irlml6402-7333200.pdf?src-supplier=Newark, ComponentLink4URL=https://datasheet.ciiva.com/7333/irlml6402-7333200.pdf?src-supplier=Newark, ComponentLink5Description=https://datasheet.ciiva.com/29326/162833-da-01-en-irlml-6402tr-29326798.pdf?src-supplier=Conrad, ComponentLink5URL=https://datasheet.ciiva.com/29326/162833-da-01-en-irlml-6402tr-29326798.pdf?src-supplier=Conrad, ComponentLink6Description=https://datasheet.ciiva.com/7799/13209-7799018.pdf?src-supplier=Element14, ComponentLink6URL=https://datasheet.ciiva.com/7799/13209-7799018.pdf?src-supplier=Element14, ComponentLink7Description=https://datasheet.ciiva.com/936/irlml6402pbf-936987.pdf?src-supplier=Digi-Key, ComponentLink7URL=https://datasheet.ciiva.com/936/irlml6402pbf-936987.pdf?src-supplier=Digi-Key, ComponentLink8Description=https://datasheet.ciiva.com/936/irlml6402pbf-936988.pdf?src-supplier=Digi-Key, ComponentLink8URL=https://datasheet.ciiva.com/936/irlml6402pbf-936988.pdf?src-supplier=Digi-Key, ComponentLink9Description=https://datasheet.ciiva.com/16311/irlml6402pbf-16311535.pdf?src-supplier=Future+Electronics, ComponentLink9URL=https://datasheet.ciiva.com/16311/irlml6402pbf-16311535.pdf?src-supplier=Future+Electronics, Drain-source On Resistance-Max=65mR, Dual Supply Voltage=-20V, Element Configuration=Single, Fall Time=381ns, Height=1.02mm, Lead Free="Lead Free", Length=3.04mm, Manufacturer Part Number=IRLML6402TRPBF, Mount="Surface Mount", Nominal Vgs=-550mV, Number of Elements=1, Number of Pins=3, On-State Resistance=65mR, Packaging="Tape and Reel", Power Dissipation=1.3W, Radiation Hardening=No, Rds On Max=65mR, REACH SVHC="No SVHC", Rise Time=48ns, RoHS=Yes, RoHS Compliant=Yes, Series=HEXFET®, Supplier 1=Newark, Termination=SMD/SMT, Turn-Off Delay Time=588ns, Turn-On Delay Time=350ns, Voltage Rating (DC)=-20V, Width=1.4mm
Q9 Q10 Q11 Q12 Q13 Q14 Q15 Q16 Q29 Q30: "NPN Ic=100mA Vceo=45V hfe=200~450 P=250mW", Manufacturer=Nexperia, Category=BJTs, ComponentLink1Description=http://www.farnell.com/datasheets/1856333.pdf?src-supplier=Farnell, ComponentLink1URL=http://www.farnell.com/datasheets/1856333.pdf?src-supplier=Farnell, ComponentLink2Description=https://assets.nexperia.com/documents/data-sheet/BC847_SER.pdf?src-supplier=Digi-Key, ComponentLink2URL=https://assets.nexperia.com/documents/data-sheet/BC847_SER.pdf?src-supplier=Digi-Key, ComponentLink3Description=http://www.farnell.com/datasheets/1856333.pdf?src-supplier=Newark, ComponentLink3URL=http://www.farnell.com/datasheets/1856333.pdf?src-supplier=Newark, Manufacturer Part Number=BC847B,215, Pricing 1="1=0.09880, 10=0.09780, 25=0.08510, 100=0.03610, 250=0.03050, 500=0.03020, 1000=0.01780, 3000=0.01760, 15000=0.01740 (USD)", RoHS=Yes, RoHS Compliant=Yes, Stock 1=29122, Supplier 1="Arrow Electronics", Supplier Part Number 1=BC847B,215
Q17 Q24: "PNP Ic=-100mA Vceo=-45V hfe=420~800 P=250mW", Manufacturer=Nexperia, ComponentLink1Description=http://www.farnell.com/datasheets/490737.pdf?src-supplier=Farnell, ComponentLink1URL=http://www.farnell.com/datasheets/490737.pdf?src-supplier=Farnell, ComponentLink2Description=https://assets.nexperia.com/documents/data-sheet/BC856_BC857_BC858.pdf?src-supplier=Digi-Key, ComponentLink2URL=https://assets.nexperia.com/documents/data-sheet/BC856_BC857_BC858.pdf?src-supplier=Digi-Key, ComponentLink3Description=http://www.semiconductors.philips.com/acrobat/datasheets/BC856_BC857_BC858_6.pdf?src-supplier=Newark, ComponentLink3URL=http://www.semiconductors.philips.com/acrobat/datasheets/BC856_BC857_BC858_6.pdf?src-supplier=Newark, Manufacturer Part Number=BC857C,215, Pricing 1="1=0.10380, 10=0.09690, 25=0.09560, 100=0.06510, 250=0.04590, 500=0.03870, 1000=0.02580, 3000=0.01620, 15000=0.01600, 30000=0.01420 (USD)", RoHS=Yes, RoHS Compliant=Yes, Stock 1=72007, Supplier 1="Arrow Electronics", Supplier Part Number 1=BC857C,215